# Altium PCB HIL_project.PcbDoc (part 2 of 3)
Units mm, origin at the board's own origin, x right, y up, seen from the top; angles counter-clockwise.
Board outline 165 x 120 mm, 2 copper layers (Top Layer, Bottom Layer); 116 components, 232 nets, 732 pads, 1218 vias.
Unrouted connection lines stored in the file: 107.
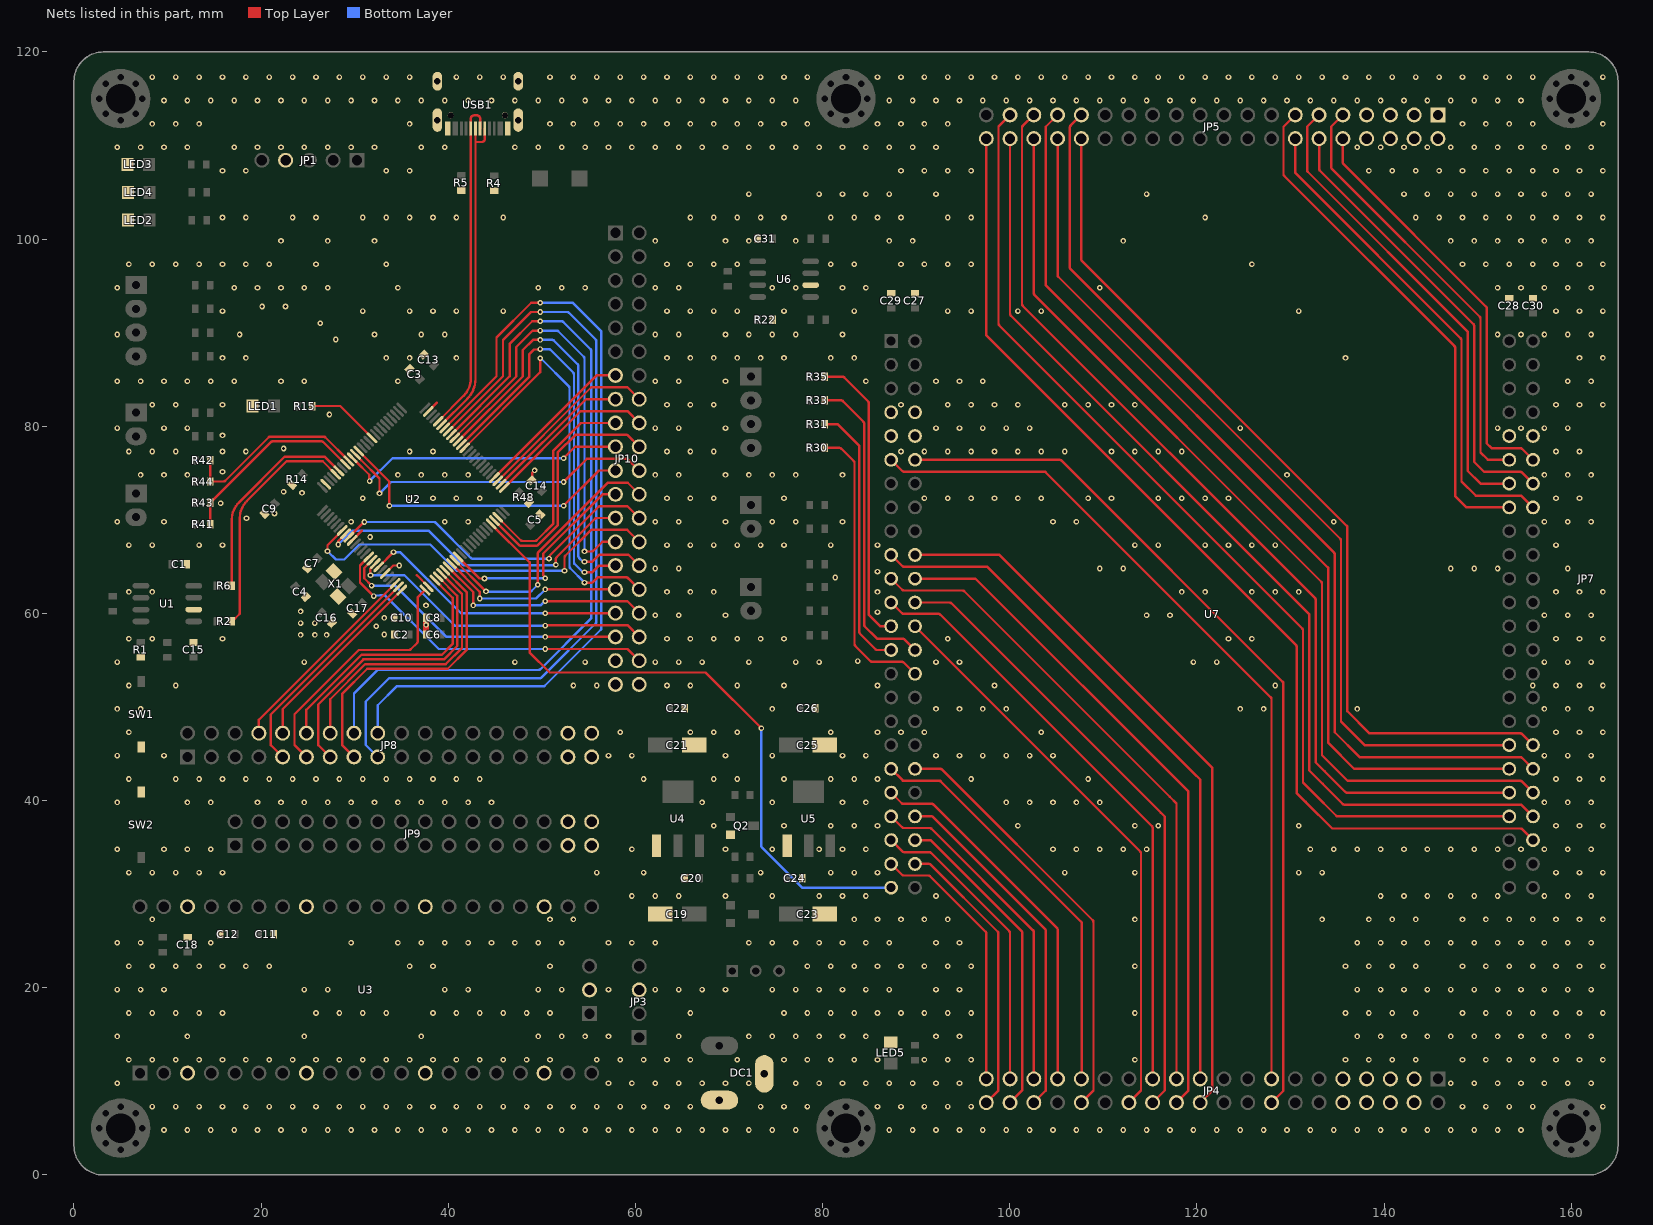
[diagram p2: the nets of this part, all layers, seen from the top]

## Via types
v1: diameter 0.6, hole 0.3, Top Layer to Bottom Layer, tented both sides, 1218 vias

## Nets (pads, with @x,y where several pads share a name; then routed paths per layer and width w, separated by ;. In a path a pad name is that pad's centre, name@x,y a point inside that pad or via, vN(x,y) a via of type N, cw(c..) or ccw(c..) an arc to the next point about the centre after c; other vN are vias at no path point) (continued)
DUT_PC7: JP4.16 U7.37 | length 43.9
  Top Layer w0.254: U7.37@87.329,43.394 88.583,42.14 92.43,42.14 cw(c92.43,41.886) 92.557,42.106 cw(c92.43,41.886) 92.609,42.066 107.626,27.049 cw(c107.446,26.87) 107.666,26.997 cw(c107.446,26.87) 107.7,26.87 107.7,10.321 JP4.16@107.649,10.27
DUT_PC8: JP4.25 U7.38 | length 45.7
  Top Layer w0.254: U7.38@89.869,43.394 92.576,43.394 cw(c92.576,43.14) 92.728,43.343 cw(c92.576,43.14) 92.755,43.32 108.868,27.207 cw(c108.687,27.028) 108.891,27.181 cw(c108.687,27.028) 108.941,27.028 108.941,9.022 JP4.25@107.649,7.73
DUT_PC10: R30.1 U7.30 | length 31.1
  Top Layer w0.254: R30.1@80.217,77.684 81.811,77.684 cw(c81.811,77.43) 81.963,77.633 cw(c81.811,77.43) 81.99,77.61 83.34,76.26 cw(c83.16,76.08) 83.414,76.08 83.414,56.715 ccw(c83.668,56.716) 83.488,56.537 83.489,56.536 85.126,54.899 85.127,54.898 ccw(c85.305,55.079) 85.304,54.825 88.493,54.825 cw(c88.493,54.571) 88.672,54.751 U7.30@89.869,53.554
DUT_PC11: R31.1 U7.27 | length 28.8
  Top Layer w0.254: R31.1@80.217,80.224 81.521,80.224 cw(c81.521,79.97) 81.673,80.173 cw(c81.521,79.97) 81.7,80.15 83.852,77.998 cw(c83.673,77.818) 83.927,77.818 83.927,58.002 ccw(c84.181,58.003) 84,57.825 84.001,57.824 85.658,56.167 ccw(c85.836,56.348) 85.835,56.094 U7.27@87.329,56.094
DUT_PC12: R33.1 U7.28 | length 33.4
  Top Layer w0.254: R33.1@80.217,82.764 81.981,82.764 cw(c81.981,82.51) 82.133,82.713 cw(c81.981,82.51) 82.16,82.69 84.362,80.488 cw(c84.183,80.308) 84.437,80.308 84.437,58.793 ccw(c84.691,58.794) 84.51,58.615 84.511,58.614 85.752,57.373 ccw(c85.93,57.554) 85.929,57.3 88.558,57.3 cw(c88.558,57.046) 88.737,57.226 U7.28@89.869,56.094
DUT_PC13: JP5.7 U7.63 | length 55.1
  Top Layer w0.254: JP5.7@130.509,113.27 129.25,112.011 129.25,106.93 ccw(c129.504,106.93) 129.301,106.778 ccw(c129.504,106.93) 129.324,106.751 147.513,88.562 cw(c147.334,88.382) 147.537,88.534 cw(c147.334,88.382) 147.588,88.382 147.588,72.537 148.791,71.334 U7.63@153.369,71.334
DUT_PD0: R35.1 U7.25 | length 31.4
  Top Layer w0.254: R35.1@80.217,85.304 82.116,85.304 cw(c82.116,85.05) 82.268,85.253 cw(c82.116,85.05) 82.295,85.23 84.851,82.674 cw(c84.671,82.494) 84.925,82.494 84.925,59.954 ccw(c85.179,59.955) 84.999,59.776 85,59.775 86.067,58.708 ccw(c86.246,58.888) 86.246,58.634 U7.25@87.329,58.634
DUT_PD1: JP4.27 U7.26 | length 61.4
  Top Layer w0.254: U7.26@89.869,58.634 113.948,34.555 cw(c113.768,34.376) 113.971,34.528 cw(c113.768,34.376) 114.022,34.376 114.022,9.023 JP4.27@112.729,7.73
DUT_PD2: JP4.13 U7.23 | length 64.8
  Top Layer w0.254: U7.23@87.329,61.174 88.479,60.024 ccw(c88.658,60.204) 88.658,59.95 92.395,59.95 cw(c92.395,59.696) 92.547,59.899 cw(c92.395,59.696) 92.574,59.876 115.195,37.255 cw(c115.015,37.076) 115.218,37.228 cw(c115.015,37.076) 115.269,37.076 JP4.13@115.269,10.27
DUT_PD3: JP4.28 U7.24 | length 67.3
  Top Layer w0.254: U7.24@89.869,61.174 93.571,61.174 cw(c93.571,60.92) 93.723,61.123 cw(c93.571,60.92) 93.75,61.1 116.134,38.716 116.561,38.289 116.561,9.022 JP4.28@115.269,7.73
DUT_PD4: JP4.12 U7.21 | length 69.8
  Top Layer w0.254: U7.21@87.329,63.714 88.519,62.524 ccw(c88.698,62.704) 88.698,62.45 94.951,62.45 cw(c94.951,62.196) 95.104,62.399 cw(c94.951,62.196) 95.131,62.376 117.101,40.405 117.809,39.697 JP4.12@117.809,10.27
DUT_PD5: JP4.29 U7.22 | length 72.4
  Top Layer w0.254: U7.22@89.869,63.714 96.335,63.714 119.09,40.959 119.09,9.011 JP4.29@117.809,7.73
DUT_PD6: JP4.11 U7.19 | length 74.9
  Top Layer w0.254: U7.19@87.329,66.254 88.534,65.049 ccw(c88.713,65.229) 88.713,64.975 97.613,64.975 98.531,64.056 ; 98.528,64.06 119.638,42.95 120.349,42.239 JP4.11@120.349,10.27
DUT_PD7: JP4.30 U7.20 | length 77.5
  Top Layer w0.254: U7.20@89.869,66.254 98.892,66.254 121.65,43.496 121.65,9.031 JP4.30@120.349,7.73
DUT_PD9: JP4.20 U7.45 | length 28.8
  Top Layer w0.254: U7.45@87.329,33.234 88.489,32.074 ccw(c88.668,32.254) 88.668,32 91.295,32 cw(c91.295,31.746) 91.447,31.949 cw(c91.295,31.746) 91.474,31.926 97.415,25.985 cw(c97.235,25.806) 97.438,25.958 cw(c97.235,25.806) 97.489,25.806 JP4.20@97.489,10.27
DUT_PD10: JP4.21 U7.46 | length 30.6
  Top Layer w0.254: U7.46@89.869,33.234 91.361,33.234 cw(c91.361,32.98) 91.513,33.183 cw(c91.361,32.98) 91.54,33.16 98.708,25.992 cw(c98.528,25.813) 98.731,25.965 cw(c98.528,25.813) 98.782,25.813 98.782,9.023 JP4.21@97.489,7.73
DUT_PD11: JP4.19 U7.43 | length 32.4
  Top Layer w0.254: U7.43@87.329,35.774 88.529,34.574 ccw(c88.708,34.754) 88.708,34.5 91.395,34.5 cw(c91.395,34.246) 91.547,34.449 cw(c91.395,34.246) 91.574,34.426 99.955,26.045 cw(c99.775,25.866) 99.978,26.018 cw(c99.775,25.866) 100.029,25.866 JP4.19@100.029,10.27
DUT_PD12: JP4.22 U7.44 | length 34.3
  Top Layer w0.254: U7.44@89.869,35.774 91.446,35.774 cw(c91.446,35.52) 91.598,35.723 cw(c91.446,35.52) 91.625,35.7 101.248,26.077 cw(c101.067,25.898) 101.271,26.051 cw(c101.067,25.898) 101.321,25.898 101.321,9.022 JP4.22@100.029,7.73
DUT_PD13: JP4.18 U7.41 | length 36.1
  Top Layer w0.254: U7.41@87.329,38.314 88.494,37.149 ccw(c88.673,37.329) 88.673,37.075 91.445,37.075 cw(c91.445,36.821) 91.597,37.024 cw(c91.445,36.821) 91.624,37.001 102.495,26.13 cw(c102.315,25.951) 102.518,26.103 cw(c102.315,25.951) 102.569,25.951 JP4.18@102.569,10.27
DUT_PD14: JP4.23 U7.42 | length 38
  Top Layer w0.254: U7.42@89.869,38.314 91.631,38.314 cw(c91.631,38.06) 91.783,38.263 cw(c91.631,38.06) 91.81,38.24 103.776,26.274 cw(c103.596,26.095) 103.799,26.247 cw(c103.596,26.095) 103.85,26.095 103.85,9.011 JP4.23@102.569,7.73
DUT_PD15: JP4.17 U7.39 | length 39.8
  Top Layer w0.254: U7.39@87.329,40.854 88.459,39.724 ccw(c88.638,39.904) 88.638,39.65 91.67,39.65 cw(c91.67,39.396) 91.822,39.599 cw(c91.67,39.396) 91.849,39.576 105.035,26.39 cw(c104.855,26.211) 105.058,26.363 cw(c104.855,26.211) 105.109,26.211 JP4.17@105.109,10.27
DUT_PE0: JP4.8 U7.11 | length 91.8
  Top Layer w0.254: U7.11@87.329,76.414 88.519,75.224 ccw(c88.698,75.404) 88.698,75.15 103.67,75.15 cw(c103.67,74.896) 103.822,75.099 cw(c103.67,74.896) 103.849,75.076 127.895,51.03 cw(c127.715,50.851) 127.918,51.003 cw(c127.715,50.851) 127.969,50.851 JP4.8@127.969,10.27
DUT_PE1: JP4.33 U7.12 | length 94.6
  Top Layer w0.254: U7.12@89.869,76.414 105.331,76.414 cw(c105.331,76.16) 105.483,76.363 cw(c105.331,76.16) 105.51,76.34 129.161,52.689 cw(c128.981,52.51) 129.184,52.662 cw(c128.981,52.51) 129.235,52.51 129.235,8.996 JP4.33@127.969,7.73
DUT_PE2: JP5.36 U7.60 | length 44.6
  Top Layer w0.254: JP5.36@135.589,110.73 135.589,108.191 ccw(c135.843,108.191) 135.64,108.039 ccw(c135.843,108.191) 135.663,108.012 150.901,92.774 cw(c150.721,92.595) 150.941,92.722 cw(c150.721,92.595) 150.975,92.595 150.975,78.175 151.485,77.665 154.553,77.665 cw(c154.553,77.411) 154.732,77.591 U7.60@155.909,76.414
DUT_PE3: JP5.5 U7.59 | length 46.6
  Top Layer w0.254: JP5.5@135.589,113.27 134.35,112.031 134.35,107.68 ccw(c134.604,107.68) 134.401,107.528 ccw(c134.604,107.68) 134.424,107.501 150.224,91.701 cw(c150.044,91.522) 150.247,91.675 cw(c150.044,91.522) 150.298,91.522 150.298,77.202 151.086,76.414 U7.59@153.369,76.414
DUT_PE4: JP5.35 U7.62 | length 48.6
  Top Layer w0.254: JP5.35@133.049,110.73 133.049,107.506 ccw(c133.303,107.506) 133.1,107.354 ccw(c133.303,107.506) 133.123,107.327 149.546,90.904 cw(c149.366,90.725) 149.569,90.877 cw(c149.366,90.725) 149.62,90.725 149.62,76.205 150.7,75.125 154.553,75.125 cw(c154.553,74.871) 154.732,75.051 U7.62@155.909,73.874
DUT_PE5: JP5.6 U7.61 | length 50.6
  Top Layer w0.254: JP5.6@133.049,113.27 131.775,111.996 131.775,107.38 ccw(c132.029,107.38) 131.826,107.228 ccw(c132.029,107.38) 131.849,107.201 148.868,90.182 cw(c148.689,90.002) 148.892,90.154 cw(c148.689,90.002) 148.943,90.002 148.943,75.232 150.301,73.874 U7.61@153.369,73.874
DUT_PE6: JP5.34 U7.64 | length 52.7
  Top Layer w0.254: JP5.34@130.509,110.73 130.509,107.171 ccw(c130.763,107.171) 130.56,107.019 ccw(c130.763,107.171) 130.583,106.992 148.191,89.384 cw(c148.011,89.204) 148.214,89.357 cw(c148.011,89.204) 148.265,89.204 148.265,74.11 149.79,72.585 154.553,72.585 cw(c154.553,72.331) 154.732,72.511 U7.64@155.909,71.334
DUT_PE7: JP5.25 U7.84 | length 94.3
  Top Layer w0.254: JP5.25@107.649,110.73 107.649,97.831 ccw(c107.903,97.831) 107.7,97.679 ccw(c107.903,97.831) 107.723,97.652 135.997,69.378 cw(c135.818,69.198) 136.021,69.35 cw(c135.818,69.198) 136.072,69.198 136.072,49.554 138.441,47.185 154.553,47.185 cw(c154.553,46.931) 154.732,47.111 U7.84@155.909,45.934
DUT_PE8: JP5.16 U7.83 | length 96.3
  Top Layer w0.254: JP5.16@107.649,113.27 106.499,112.12 ccw(c106.679,111.941) 106.476,112.093 ccw(c106.679,111.941) 106.425,111.941 106.425,96.98 ccw(c106.679,96.98) 106.476,96.828 ccw(c106.679,96.98) 106.499,96.801 135.32,67.98 cw(c135.14,67.8) 135.344,67.953 cw(c135.14,67.8) 135.394,67.8 135.394,48.454 137.914,45.934 U7.83@153.369,45.934
DUT_PE9: JP5.24 U7.86 | length 98.5
  Top Layer w0.254: JP5.24@105.109,110.73 105.109,96.146 ccw(c105.363,96.146) 105.16,95.994 ccw(c105.363,96.146) 105.183,95.967 134.643,66.507 cw(c134.463,66.328) 134.666,66.48 cw(c134.463,66.328) 134.717,66.328 134.717,47.305 137.377,44.645 154.553,44.645 cw(c154.553,44.391) 154.732,44.571 U7.86@155.909,43.394
DUT_PE10: JP5.17 U7.85 | length 100.6
  Top Layer w0.254: JP5.17@105.109,113.27 103.85,112.011 103.85,95.155 ccw(c104.104,95.155) 103.901,95.003 ccw(c104.104,95.155) 103.924,94.976 133.965,64.935 cw(c133.786,64.755) 133.989,64.908 cw(c133.786,64.755) 134.04,64.755 134.04,46.155 136.801,43.394 U7.85@153.369,43.394
DUT_PE11: JP5.23 U7.88 | length 102.8
  Top Layer w0.254: JP5.23@102.569,110.73 102.569,94.211 ccw(c102.823,94.211) 102.62,94.059 ccw(c102.823,94.211) 102.643,94.032 133.288,63.387 cw(c133.108,63.208) 133.311,63.36 cw(c133.108,63.208) 133.362,63.208 133.362,44.855 136.112,42.105 154.553,42.105 cw(c154.553,41.851) 154.732,42.031 U7.88@155.909,40.854
DUT_PE12: JP5.18 U7.87 | length 104.7
  Top Layer w0.254: JP5.18@102.569,113.27 101.374,112.075 ccw(c101.554,111.896) 101.351,112.048 ccw(c101.554,111.896) 101.3,111.896 101.3,93.055 ccw(c101.554,93.055) 101.351,92.903 ccw(c101.554,93.055) 101.374,92.876 132.61,61.64 cw(c132.431,61.46) 132.634,61.612 cw(c132.431,61.46) 132.685,61.46 132.685,44.09 133.65,43.125 ; 133.646,43.129 135.848,40.927 ccw(c136.026,41.108) 136.025,40.854 U7.87@153.369,40.854
DUT_PE13: JP5.22 U7.90 | length 106.7
  Top Layer w0.254: JP5.22@100.029,110.73 100.029,92.001 ccw(c100.283,92.001) 100.08,91.849 ccw(c100.283,92.001) 100.103,91.822 131.933,59.992 cw(c131.753,59.813) 131.956,59.965 cw(c131.753,59.813) 132.007,59.813 132.007,43.218 133.425,41.8 ; 133.421,41.804 135.586,39.639 ccw(c135.765,39.819) 135.613,39.616 ccw(c135.765,39.819) 135.765,39.565 154.553,39.565 cw(c154.553,39.311) 154.732,39.491 U7.90@155.909,38.314
DUT_PE14: JP5.19 U7.89 | length 108.8
  Top Layer w0.254: JP5.19@100.029,113.27 98.8,112.041 98.8,90.955 ccw(c99.054,90.955) 98.851,90.803 ccw(c99.054,90.955) 98.874,90.776 131.255,58.395 cw(c131.076,58.215) 131.279,58.367 cw(c131.076,58.215) 131.33,58.215 131.33,41.945 132.362,40.912 ; 132.359,40.916 134.887,38.388 ccw(c135.066,38.568) 134.914,38.365 ccw(c135.066,38.568) 135.066,38.314 U7.89@153.369,38.314
DUT_PE15: JP5.21 U7.92 | length 111
  Top Layer w0.254: JP5.21@97.489,110.73 97.489,89.816 ccw(c97.743,89.816) 97.54,89.664 ccw(c97.743,89.816) 97.563,89.637 130.578,56.622 cw(c130.398,56.442) 130.602,56.595 cw(c130.398,56.442) 130.652,56.442 130.652,40.823 131.612,39.862 ; 131.609,39.866 134.45,37.025 154.553,37.025 cw(c154.553,36.771) 154.732,36.951 U7.92@155.909,35.774
DUT_POWER_STATUS: U2.46 U7.47 | length 71.9
  Top Layer w0.254: U2.46@44.584,69.571 48.692,65.463 48.692,55.831 50.839,53.684 67.5,53.684 v1(73.457,47.727)
  Bottom Layer w0.254: v1(73.457,47.727) 73.457,35.156 ccw(c73.711,35.157) 73.53,34.979 77.742,30.767 ccw(c77.92,30.948) 77.918,30.694 U7.47@87.329,30.694
GND: C1.2 C2.2 C3.2 C4.2 C5.2 C6.2 C7.2 C8.2 C9.2 C10.2 C11.2 C12.2 C13.1 C14.1 C15.1 C16.1 C17.2 C18.1 C19.2 C20.1 C21.2 C22.1 C23.2 C24.1 C25.2 C26.1 C27.2 C28.2 C29.2 C30.2 C31.2 DC1.2 DC1.3 JP1.4 JP3.3 JP4.2 JP4.3 JP4.4 JP4.5 JP4.36 JP4.37 JP4.38 JP4.39 JP5.1 JP5.2 JP5.3 JP5.4 JP5.37 JP5.38 JP5.39 JP5.40 JP7.2 JP8.17 JP8.18 JP8.19 JP8.20 JP9.15 JP9.16 JP9.17 JP9.18 JP10.19 JP10.20 JP10.21 LED1.2 LED2.2 LED3.2 LED4.2 LED5.2 Q2.1 R1.1 R4.2 R5.2 R14.2 R22.1 R48.1 SW1.1 SW2.1 U1.2 U2.10 U2.20 U2.27 U2.74 U2.99 U3.3 U3.8 U3.13 U3.18 U3.23 U3.28 U3.33 U3.38 U3.D2 U4.1 U5.1 U6.2 U7.7 U7.8 U7.9 U7.10 U7.57 U7.58 USB1.A1 USB1.B1 USB1.SHIELD X1.2 X1.4 | length 9.4
  Top Layer w0.254: U2.10@29.734,67.804 30.783,68.852 ; U2.20@33.27,64.268 34.127,65.126 v1(34.773,65.126) ; 36.629,64.091 U2.27@37.866,62.854 ; U2.74@37.866,81.592 38.797,82.523 ; C14.1@48.888,74.2 48.959,74.271 48.959,75.019 v1(49.225,75.286)
  Top Layer w0.635: C6.2@37.634,57.745 C8.2@37.634,59.523
  other v1: 9.622,4.804 12.122,4.804 14.622,4.804 17.122,4.804 19.622,4.804 22.122,4.804 24.622,4.804 27.122,4.804 29.622,4.804 32.122,4.804 34.622,4.804 37.122,4.804 39.622,4.804 42.122,4.804 44.622,4.804 47.122,4.804 49.622,4.804 52.122,4.804 54.622,4.804 57.122,4.804 59.622,4.804 62.122,4.804 64.622,4.804 67.122,4.804 69.622,4.804 72.122,4.804 74.622,4.804 77.122,4.804 87.122,4.804 89.622,4.804 92.122,4.804 94.622,4.804 97.122,4.804 99.622,4.804 102.122,4.804 104.622,4.804 107.122,4.804 109.622,4.804 112.122,4.804 114.622,4.804 117.122,4.804 119.622,4.804 122.122,4.804 124.622,4.804 127.122,4.804 129.622,4.804 132.122,4.804 134.622,4.804 137.122,4.804 139.622,4.804 142.122,4.804 144.622,4.804 147.122,4.804 149.622,4.804 152.122,4.804 154.622,4.804 8.372,7.304 10.872,7.304 13.372,7.304 15.872,7.304 18.372,7.304 20.872,7.304 23.372,7.304 25.872,7.304 28.372,7.304 30.872,7.304 33.372,7.304 35.872,7.304 38.372,7.304 40.872,7.304 43.372,7.304 45.872,7.304 48.372,7.304 50.872,7.304 53.372,7.304 55.872,7.304 58.372,7.304 60.872,7.304 63.372,7.304 65.872,7.304 73.372,7.304 75.872,7.304 78.372,7.304 85.872,7.304 88.372,7.304 90.872,7.304 93.372,7.304 95.872,7.304 148.372,7.304 150.872,7.304 153.372,7.304 155.872,7.304 163.372,7.304 4.622,9.804 57.122,9.804 59.622,9.804 62.122,9.804 64.622,9.804 67.122,9.804 69.622,9.804 72.122,9.804 77.122,9.804 79.622,9.804 82.122,9.804 84.622,9.804 87.122,9.804 89.622,9.804 92.122,9.804 94.622,9.804 147.122,9.804 149.622,9.804 152.122,9.804 154.622,9.804 157.122,9.804 159.622,9.804 162.122,9.804 5.872,12.304 8.372,12.304 10.872,12.304 13.372,12.304 15.872,12.304 18.372,12.304 20.872,12.304 23.372,12.304 25.872,12.304 28.372,12.304 30.872,12.304 33.372,12.304 35.872,12.304 38.372,12.304 40.872,12.304 43.372,12.304 45.872,12.304 48.372,12.304 50.872,12.304 55.872,12.304 58.372,12.304 60.872,12.304 63.372,12.304 65.872,12.304 70.872,12.304 75.872,12.304 78.372,12.304 80.872,12.304 83.372,12.304 85.872,12.304 90.872,12.304 93.372,12.304 95.872,12.304 113.372,12.304 135.872,12.304 138.372,12.304 140.872,12.304 143.372,12.304 148.372,12.304 150.872,12.304 153.372,12.304 155.872,12.304 158.372,12.304 160.872,12.304 163.372,12.304 4.622,14.804 12.122,14.804 24.622,14.804 37.122,14.804 49.622,14.804 52.122,14.804 54.622,14.804 57.122,14.804 64.622,14.804 72.122,14.804 74.622,14.804 77.122,14.804 79.622,14.804 82.122,14.804 84.622,14.804 92.122,14.804 94.622,14.804 137.122,14.804 139.622,14.804 142.122,14.804 144.622,14.804 147.122,14.804 149.622,14.804 152.122,14.804 154.622,14.804 157.122,14.804 159.622,14.804 162.122,14.804 5.872,17.304 8.372,17.304 10.872,17.304 13.372,17.304 15.872,17.304 25.872,17.304 28.372,17.304 30.872,17.304 33.372,17.304 38.372,17.304 40.872,17.304 43.372,17.304 45.872,17.304 48.372,17.304 50.872,17.304 65.872,17.304 75.872,17.304 78.372,17.304 80.872,17.304 83.372,17.304 85.872,17.304 88.372,17.304 90.872,17.304 93.372,17.304 95.872,17.304 113.372,17.304 135.872,17.304 138.372,17.304 140.872,17.304 143.372,17.304 148.372,17.304 150.872,17.304 153.372,17.304 155.872,17.304 158.372,17.304 160.872,17.304 163.372,17.304 4.622,19.804 7.122,19.804 9.622,19.804 24.622,19.804 27.122,19.804 39.622,19.804 42.122,19.804 49.622,19.804 52.122,19.804 57.122,19.804 62.122,19.804 64.622,19.804 67.122,19.804 69.622,19.804 74.622,19.804 77.122,19.804 79.622,19.804 82.122,19.804 84.622,19.804 87.122,19.804 92.122,19.804 94.622,19.804 137.122,19.804 139.622,19.804 142.122,19.804 144.622,19.804 147.122,19.804 149.622,19.804 152.122,19.804 154.622,19.804 157.122,19.804 159.622,19.804 162.122,19.804 5.872,22.304 8.372,22.304 10.872,22.304 13.372,22.304 15.872,22.304 18.372,22.304 20.872,22.304 35.872,22.304 38.372,22.304 50.872,22.304 78.372,22.304 80.872,22.304 83.372,22.304 85.872,22.304 88.372,22.304 90.872,22.304 93.372,22.304 95.872,22.304 113.372,22.304 135.872,22.304 138.372,22.304 140.872,22.304 143.372,22.304 148.372,22.304 150.872,22.304 153.372,22.304 155.872,22.304 158.372,22.304 160.872,22.304 163.372,22.304 4.622,24.804 7.122,24.804 14.622,24.804 29.622,24.804 34.622,24.804 37.122,24.804 39.622,24.804 42.122,24.804 44.622,24.804 47.122,24.804 49.622,24.804 52.122,24.804 57.122,24.804 59.622,24.804 62.122,24.804 72.122,24.804 74.622,24.804 77.122,24.804 79.622,24.804 82.122,24.804 84.622,24.804 87.122,24.804 92.122,24.804 94.622,24.804 137.122,24.804 139.622,24.804 142.122,24.804 144.622,24.804 147.122,24.804 149.622,24.804 152.122,24.804 154.622,24.804 157.122,24.804 159.622,24.804 162.122,24.804 8.372,27.304 50.872,27.304 53.372,27.304 83.372,27.304 85.872,27.304 88.372,27.304 90.872,27.304 93.372,27.304 113.372,27.304 133.372,27.304 138.372,27.304 140.872,27.304 143.372,27.304 148.372,27.304 150.872,27.304 153.372,27.304 155.872,27.304 158.372,27.304 160.872,27.304 163.372,27.304 59.622,29.804 62.122,29.804 64.622,29.804 69.622,29.804 74.622,29.804 79.622,29.804 82.122,29.804 84.622,29.804 92.122,29.804 139.622,29.804 142.122,29.804 144.622,29.804 147.122,29.804 149.622,29.804 152.122,29.804 157.122,29.804 159.622,29.804 162.122,29.804 5.872,32.304 8.372,32.304 10.872,32.304 13.372,32.304 15.872,32.304 55.872,32.304 60.872,32.304 73.372,32.304 80.872,32.304 83.372,32.304 85.872,32.304 105.872,32.304 113.372,32.304 130.872,32.304 133.372,32.304 158.372,32.304 160.872,32.304 163.372,32.304 4.622,34.804 9.622,34.804 12.122,34.804 14.622,34.804 59.622,34.804 69.622,34.804 74.622,34.804 79.622,34.804 82.122,34.804 84.622,34.804 104.622,34.804 107.122,34.804 109.622,34.804 112.122,34.804 114.622,34.804 132.122,34.804 134.622,34.804 137.122,34.804 139.622,34.804 142.122,34.804 144.622,34.804 147.122,34.804 149.622,34.804 152.122,34.804 154.622,34.804 157.122,34.804 159.622,34.804 162.122,34.804 68.372,37.304 75.872,37.304 80.872,37.304 83.372,37.304 85.872,37.304 100.872,37.304 113.372,37.304 115.872,37.304 130.872,37.304 158.372,37.304 160.872,37.304 163.372,37.304 4.622,39.804 12.122,39.804 14.622,39.804 19.622,39.804 22.122,39.804 24.622,39.804 27.122,39.804 29.622,39.804 32.122,39.804 34.622,39.804 37.122,39.804 39.622,39.804 42.122,39.804 44.622,39.804 67.122,39.804 74.622,39.804 82.122,39.804 84.622,39.804 99.622,39.804 102.122,39.804 104.622,39.804 107.122,39.804 109.622,39.804 157.122,39.804 159.622,39.804 162.122,39.804 5.872,42.304 10.872,42.304 13.372,42.304 15.872,42.304 18.372,42.304 20.872,42.304 23.372,42.304 25.872,42.304 28.372,42.304 30.872,42.304 33.372,42.304 35.872,42.304 38.372,42.304 40.872,42.304 43.372,42.304 60.872,42.304 68.372,42.304 70.872,42.304 75.872,42.304 80.872,42.304 83.372,42.304 85.872,42.304 95.872,42.304 108.372,42.304 158.372,42.304 160.872,42.304 163.372,42.304 4.622,44.804 9.622,44.804 57.122,44.804 59.622,44.804 69.622,44.804 74.622,44.804 82.122,44.804 84.622,44.804 92.122,44.804 94.622,44.804 97.122,44.804 99.622,44.804 102.122,44.804 104.622,44.804 157.122,44.804 159.622,44.804 162.122,44.804 5.872,47.304 58.372,47.304 65.872,47.304 68.372,47.304 70.872,47.304 80.872,47.304 85.872,47.304 88.372,47.304 90.872,47.304 103.372,47.304 158.372,47.304 160.872,47.304 163.372,47.304 4.622,49.804 7.122,49.804 74.622,49.804 92.122,49.804 94.622,49.804 97.122,49.804 99.622,49.804 124.622,49.804 127.122,49.804 137.122,49.804 157.122,49.804 159.622,49.804 162.122,49.804 5.872,52.304 10.872,52.304 53.372,52.304 55.872,52.304 63.372,52.304 65.872,52.304 70.872,52.304 75.872,52.304 85.872,52.304 98.372,52.304 128.372,52.304 155.872,52.304 158.372,52.304 160.872,52.304 163.372,52.304 4.622,54.804 24.622,54.804 47.122,54.804 54.622,54.804 62.122,54.804 64.622,54.804 67.122,54.804 72.122,54.804 77.122,54.804 79.622,54.804 92.122,54.804 94.622,54.804 119.622,54.804 122.122,54.804 157.122,54.804 159.622,54.804 162.122,54.804 83.751,54.903 5.872,57.304 8.372,57.304 15.872,57.304 63.372,57.304 65.872,57.304 68.372,57.304 70.872,57.304 73.372,57.304 75.872,57.304 93.372,57.304 123.372,57.304 125.872,57.304 158.372,57.304 160.872,57.304 163.372,57.304 24.225,57.709 25.751,57.709 27.005,57.709 33.169,57.745 32.309,58.639 37.634,58.773 24.225,58.963 25.727,58.963 33.157,59.523 62.122,59.804 64.622,59.804 69.622,59.804 114.622,59.804 117.122,59.804 157.122,59.804 159.622,59.804 162.122,59.804 85.872,60.142 24.225,60.217 37.618,60.858 5.872,62.304 8.372,62.304 63.372,62.304 65.872,62.304 68.372,62.304 85.872,62.304 118.372,62.304 120.872,62.304 125.872,62.304 128.372,62.304 130.872,62.304 158.372,62.304 160.872,62.304 163.372,62.304 81.354,63.838 85.872,64.466 62.122,64.804 64.622,64.804 109.622,64.804 112.122,64.804 147.122,64.804 149.622,64.804 152.122,64.804 159.622,64.804 5.872,67.304 8.372,67.304 13.372,67.304 15.872,67.304 63.372,67.304 65.872,67.304 68.372,67.304 70.872,67.304 73.372,67.304 75.872,67.304 80.872,67.304 85.872,67.304 113.372,67.304 115.872,67.304 120.872,67.304 123.372,67.304 125.872,67.304 128.372,67.304 158.372,67.304 31.648,68.172 4.622,69.804 9.622,69.804 29.622,69.804 39.622,69.804 42.122,69.804 62.122,69.804 64.622,69.804 69.622,69.804 74.622,69.804 77.122,69.804 82.122,69.804 104.622,69.804 107.122,69.804 134.622,69.804 157.122,69.804 159.622,69.804 162.122,69.804 18.437,70.178 21.438,70.677 15.67,71.77 30.872,72.304 35.872,72.304 38.372,72.304 40.872,72.304 43.372,72.304 63.372,72.304 65.872,72.304 68.372,72.304 75.872,72.304 90.872,72.304 93.372,72.304 95.872,72.304 98.372,72.304 100.872,72.304 103.372,72.304 108.372,72.304 110.872,72.304 115.872,72.304 118.372,72.304 120.872,72.304 123.372,72.304 158.372,72.304 160.872,72.304 24.377,72.883 22.405,72.995 7.122,74.804 9.622,74.804 12.122,74.804 34.622,74.804 37.122,74.804 39.622,74.804 42.122,74.804 62.122,74.804 64.622,74.804 69.622,74.804 72.122,74.804 74.622,74.804 77.122,74.804 82.122,74.804 129.622,74.804 157.122,74.804 159.622,74.804 162.122,74.804 15.872,75.133 5.872,77.304 8.372,77.304 10.872,77.304 15.872,77.304 18.372,77.304 35.872,77.304 38.372,77.304 63.372,77.304 65.872,77.304 68.372,77.304 88.372,77.304 90.872,77.304 93.372,77.304 95.872,77.304 98.372,77.304 100.872,77.304 103.372,77.304 105.872,77.304 110.872,77.304 113.372,77.304 115.872,77.304 118.372,77.304 158.372,77.304 160.872,77.304 22.405,77.619 15.872,79.019 4.622,79.804 9.622,79.804 12.122,79.804 62.122,79.804 64.622,79.804 69.622,79.804 92.122,79.804 94.622,79.804 97.122,79.804 99.622,79.804 102.122,79.804 124.622,79.804 152.122,79.804 154.622,79.804 157.122,79.804 159.622,79.804 27.3,81.257 8.372,82.304 10.872,82.304 15.872,82.304 63.372,82.304 65.872,82.304 68.372,82.304 88.372,82.304 93.372,82.304 95.872,82.304 98.372,82.304 100.872,82.304 105.872,82.304 108.372,82.304 110.872,82.304 113.372,82.304 158.372,82.304 160.872,82.304 163.372,82.304 4.622,84.804 7.122,84.804 9.622,84.804 12.122,84.804 14.622,84.804 17.122,84.804 22.122,84.804 24.622,84.804 34.622,84.804 62.122,84.804 64.622,84.804 69.622,84.804 84.622,84.804 92.122,84.804 94.622,84.804 97.122,84.804 159.622,84.804 162.122,84.804 15.872,87.304 18.372,87.304 33.372,87.304 35.872,87.304 40.872,87.304 63.372,87.304 65.872,87.304 68.372,87.304 70.872,87.304 73.372,87.304 75.872,87.304 80.872,87.304 83.372,87.304 135.872,87.304 160.872,87.304 163.372,87.304 27.981,89.265 4.622,89.804 17.702,89.804 32.122,89.804 37.122,89.804 39.622,89.804 62.122,89.804 64.622,89.804 69.622,89.804 72.122,89.804 74.622,89.804 77.122,89.804 82.122,89.804 152.122,89.804 154.622,89.804 157.122,89.804 159.622,89.804 162.122,89.804 26.314,91.008 15.872,92.304 30.872,92.304 35.872,92.304 38.372,92.304 40.872,92.304 45.872,92.304 63.372,92.304 65.872,92.304 68.372,92.304 70.872,92.304 75.872,92.304 83.372,92.304 93.372,92.304 95.872,92.304 100.872,92.304 103.372,92.304 130.872,92.304 158.372,92.304 160.872,92.304 163.372,92.304 20.11,92.8 22.61,92.8 4.622,94.804 17.122,94.804 19.622,94.804 22.122,94.804 24.622,94.804 27.122,94.804 34.622,94.804 49.622,94.804 52.122,94.804 54.622,94.804 62.122,94.804 64.622,94.804 74.622,94.804 77.122,94.804 82.122,94.804 84.622,94.804 109.622,94.804 152.122,94.804 154.622,94.804 157.122,94.804 159.622,94.804 162.122,94.804 5.872,97.304 8.372,97.304 10.872,97.304 13.372,97.304 15.872,97.304 18.372,97.304 20.872,97.304 25.872,97.304 33.372,97.304 63.372,97.304 65.872,97.304 68.372,97.304 70.872,97.304 80.872,97.304 83.372,97.304 88.372,97.304 90.872,97.304 93.372,97.304 95.872,97.304 125.872,97.304 148.372,97.304 150.872,97.304 153.372,97.304 155.872,97.304 158.372,97.304 160.872,97.304 163.372,97.304 22.122,99.804 27.122,99.804 32.122,99.804 62.122,99.804 69.622,99.804 72.122,99.804 77.122,99.804 87.122,99.804 89.622,99.804 112.122,99.804 147.122,99.804 149.622,99.804 152.122,99.804 154.622,99.804 157.122,99.804 159.622,99.804 162.122,99.804 15.872,102.304 18.372,102.304 23.372,102.304 25.872,102.304 30.872,102.304 33.372,102.304 35.872,102.304 38.372,102.304 40.872,102.304 45.872,102.304 65.872,102.304 68.372,102.304 70.872,102.304 73.372,102.304 75.872,102.304 80.872,102.304 83.372,102.304 85.872,102.304 88.372,102.304 93.372,102.304 95.872,102.304 120.872,102.304 143.372,102.304 145.872,102.304 148.372,102.304 150.872,102.304 153.372,102.304 155.872,102.304 158.372,102.304 160.872,102.304 163.372,102.304 72.122,104.804 79.622,104.804 82.122,104.804 84.622,104.804 87.122,104.804 92.122,104.804 114.622,104.804 142.122,104.804 144.622,104.804 147.122,104.804 149.622,104.804 152.122,104.804 154.622,104.804 157.122,104.804 159.622,104.804 162.122,104.804 15.872,107.304 18.372,107.304 33.372,107.304 35.872,107.304 88.372,107.304 90.872,107.304 93.372,107.304 95.872,107.304 138.372,107.304 140.872,107.304 143.372,107.304 145.872,107.304 148.372,107.304 150.872,107.304 153.372,107.304 155.872,107.304 158.372,107.304 160.872,107.304 163.372,107.304 4.622,109.804 7.122,109.804 9.622,109.804 12.122,109.804 17.122,109.804 19.622,109.804 22.122,109.804 24.622,109.804 27.122,109.804 29.622,109.804 32.122,109.804 37.122,109.804 39.622,109.804 47.122,109.804 49.622,109.804 52.122,109.804 54.622,109.804 57.122,109.804 59.622,109.804 62.122,109.804 64.622,109.804 67.122,109.804 69.622,109.804 72.122,109.804 74.622,109.804 77.122,109.804 79.622,109.804 82.122,109.804 84.622,109.804 87.122,109.804 89.622,109.804 92.122,109.804 137.122,109.804 139.622,109.804 142.122,109.804 144.622,109.804 147.122,109.804 149.622,109.804 152.122,109.804 154.622,109.804 157.122,109.804 159.622,109.804 162.122,109.804 8.372,112.304 10.872,112.304 13.372,112.304 35.872,112.304 50.872,112.304 53.372,112.304 55.872,112.304 58.372,112.304 60.872,112.304 63.372,112.304 65.872,112.304 68.372,112.304 70.872,112.304 73.372,112.304 75.872,112.304 78.372,112.304 85.872,112.304 88.372,112.304 90.872,112.304 93.372,112.304 148.372,112.304 150.872,112.304 153.372,112.304 155.872,112.304 163.372,112.304 9.622,114.804 12.122,114.804 14.622,114.804 17.122,114.804 19.622,114.804 22.122,114.804 24.622,114.804 27.122,114.804 29.622,114.804 32.122,114.804 34.622,114.804 37.122,114.804 39.622,114.804 42.122,114.804 44.622,114.804 47.122,114.804 49.622,114.804 52.122,114.804 54.622,114.804 57.122,114.804 59.622,114.804 62.122,114.804 64.622,114.804 67.122,114.804 69.622,114.804 72.122,114.804 74.622,114.804 77.122,114.804 87.122,114.804 89.622,114.804 92.122,114.804 94.622,114.804 97.122,114.804 99.622,114.804 102.122,114.804 104.622,114.804 107.122,114.804 109.622,114.804 112.122,114.804 114.622,114.804 117.122,114.804 119.622,114.804 122.122,114.804 124.622,114.804 127.122,114.804 129.622,114.804 132.122,114.804 134.622,114.804 137.122,114.804 139.622,114.804 142.122,114.804 144.622,114.804 147.122,114.804 149.622,114.804 152.122,114.804 154.622,114.804 8.372,117.304 10.872,117.304 13.372,117.304 15.872,117.304 18.372,117.304 20.872,117.304 23.372,117.304 25.872,117.304 28.372,117.304 30.872,117.304 33.372,117.304 35.872,117.304 40.872,117.304 43.372,117.304 45.872,117.304 50.872,117.304 53.372,117.304 55.872,117.304 58.372,117.304 60.872,117.304 63.372,117.304 65.872,117.304 68.372,117.304 70.872,117.304 73.372,117.304 75.872,117.304 78.372,117.304 85.872,117.304 88.372,117.304 90.872,117.304 93.372,117.304 95.872,117.304 98.372,117.304 100.872,117.304 103.372,117.304 105.872,117.304 108.372,117.304 110.872,117.304 113.372,117.304 115.872,117.304 118.372,117.304 120.872,117.304 123.372,117.304 125.872,117.304 128.372,117.304 130.872,117.304 133.372,117.304 135.872,117.304 138.372,117.304 140.872,117.304 143.372,117.304 145.872,117.304 148.372,117.304 150.872,117.304 153.372,117.304 155.872,117.304 163.372,117.304
HIL_CAN_RX: R6.2 U2.95 | length 22.5
  Top Layer w0.254: R6.2@16.882,62.952 16.882,70.055 cw(c19.422,70.055) 17.626,71.851 22.534,76.759 26.789,76.759 U2.95@28.32,75.228
HIL_CAN_TX: R2.2 U2.96 | length 25.2
  Top Layer w0.254: R2.2@16.882,59.142 17.659,59.919 ccw(c17.479,60.098) 17.682,59.946 ccw(c17.479,60.098) 17.733,60.098 17.733,70.22 cw(c20.273,70.22) 18.477,72.016 22.719,76.259 26.582,76.259 U2.96@27.966,74.875
HIL_D_N: U2.70 USB1.A7 USB1.B7 | length 35.3
  Top Layer w0.254: U2.70@39.28,80.178 42.022,82.92 ccw(c39.867,85.075) 42.915,85.075 42.915,110.369 ; USB1.A7@42.907,111.799 42.915,111.791 42.915,110.369 ; USB1.B7@43.907,111.799 43.907,110.719 cw(c43.557,110.719) 43.557,110.369 42.915,110.369
HIL_D_P: U2.71 USB1.A6 USB1.B6 | length 36.1
  Top Layer w0.254: U2.71@38.927,80.532 38.927,80.543 41.663,83.279 ccw(c39.867,85.075) 42.407,85.075 USB1.B6@42.407,111.799 42.407,112.865 cw(c42.757,112.865) 42.757,113.215 43.082,113.215 cw(c43.082,112.89) 43.407,112.89 USB1.A6@43.407,111.799
HIL_DEBUG_LED: R15.2 U2.85 | length 7.8
  Top Layer w0.254: R15.2@25.467,82.159 28.46,82.159 U2.85@31.856,78.764
HIL_I2C1_SCL: R41.2 R43.1 U2.93 | length 20.5
  Top Layer w0.254: R41.2@14.556,69.524 R43.1@14.556,71.81 21.062,78.316 cw(c21.241,78.136) 21.089,78.339 cw(c21.241,78.136) 21.241,78.39 26.467,78.39 cw(c26.467,78.136) 26.647,78.316 U2.93@29.027,75.935
HIL_I2C1_SDA: R42.2 R44.1 U2.92 | length 20.1
  Top Layer w0.254: R42.2@14.556,76.382 R44.1@14.556,74.096 15.991,74.096 ccw(c15.991,74.35) 16.143,74.147 ccw(c15.991,74.35) 16.17,74.17 20.818,78.818 ; 20.819,78.819 cw(c20.998,78.638) 20.845,78.842 cw(c20.998,78.638) 20.998,78.892 26.672,78.892 cw(c26.672,78.638) 26.852,78.818 U2.92@29.381,76.289
HIL_PA0: JP8.33 U2.23 | length 22
  Top Layer w0.254: JP8.33@19.765,47.204 19.765,48.642 U2.23@34.33,63.207
HIL_PA1: JP8.5 U2.24 | length 24.4
  Top Layer w0.254: JP8.5@22.305,44.664 21.035,45.934 21.035,49.205 U2.24@34.684,62.854
HIL_PA2: JP8.32 U2.25 | length 20.6
  Top Layer w0.254: JP8.32@22.305,47.204 22.305,49.768 U2.25@35.038,62.5
HIL_PA3: JP8.6 U2.26 | length 27.3
  Top Layer w0.254: JP8.6@24.845,44.664 23.575,45.934 23.575,49.236 30.433,56.094 35.821,56.094 ccw(c35.821,56.348) 35.974,56.145 ccw(c35.821,56.348) 36,56.168 36.653,56.821 ccw(c36.473,57) 36.676,56.848 ccw(c36.473,57) 36.727,57 36.727,61.715 U2.26@37.512,62.5
HIL_PA4: JP8.31 U2.29 | length 28.6
  Top Layer w0.254: JP8.31@24.845,47.204 24.845,49.706 30.725,55.586 39.323,55.586 40.466,56.729 40.466,61.668 39.193,62.941 U2.29@38.573,63.561
HIL_PA5: JP8.7 U2.30 | length 31.8
  Top Layer w0.254: JP8.7@27.385,44.664 26.115,45.934 26.115,50.269 30.932,55.086 39.53,55.086 40.966,56.522 40.966,61.875 U2.30@38.927,63.915
HIL_PA6: JP8.30 U2.31 | length 28.8
  Top Layer w0.254: JP8.30@27.385,47.204 27.385,50.832 31.139,54.586 39.737,54.586 41.466,56.315 41.466,62.082 U2.31@39.28,64.268
HIL_PA7: JP8.8 U2.32 | length 32
  Top Layer w0.254: JP8.8@29.925,44.664 28.655,45.934 28.655,51.395 31.346,54.086 39.944,54.086 41.966,56.108 41.966,62.289 U2.32@39.634,64.622
HIL_PA8: JP8.29 U2.67 | length 84.8
  Top Layer w0.254: U2.67@40.341,79.117 46.558,85.335 46.558,88.799 48.976,91.217 v1(49.835,91.217)
  Bottom Layer w0.254: JP8.29@29.925,47.204 29.925,51.45 32.425,53.95 49.65,53.95 ccw(c49.65,54.204) 49.803,54.001 ccw(c49.65,54.204) 49.829,54.024 55.206,59.401 ccw(c55.026,59.58) 55.229,59.427 ccw(c55.026,59.58) 55.28,59.58 55.28,88.042 ccw(c55.026,88.042) 55.206,88.221 52.284,91.143 ccw(c52.105,90.963) 52.258,91.166 ccw(c52.105,90.963) 52.105,91.217 v1(49.835,91.217)
HIL_PA9: JP8.9 U2.68 | length 89.4
  Top Layer w0.254: U2.68@39.987,79.471 45.854,85.338 45.854,89.212 48.851,92.208 v1(49.835,92.208)
  Bottom Layer w0.254: JP8.9@32.465,44.664 31.175,45.954 31.175,50.575 33.675,53.075 49.769,53.075 ccw(c49.769,53.329) 49.922,53.126 ccw(c49.769,53.329) 49.948,53.149 55.751,58.952 ccw(c55.571,59.131) 55.774,58.978 ccw(c55.571,59.131) 55.825,59.131 55.825,89.093 ccw(c55.571,89.093) 55.751,89.272 52.889,92.134 ccw(c52.71,91.954) 52.862,92.158 ccw(c52.71,91.954) 52.71,92.208 v1(49.835,92.208)
HIL_PA10: JP8.28 U2.69 | length 88
  Top Layer w0.254: U2.69@39.634,79.824 45.15,85.341 45.15,89.475 48.875,93.2 v1(49.835,93.2)
  Bottom Layer w0.254: JP8.28@32.465,47.204 32.465,50.19 34.475,52.2 50.139,52.2 ccw(c50.139,52.454) 50.291,52.251 ccw(c50.139,52.454) 50.318,52.274 56.294,58.249 ccw(c56.113,58.428) 56.317,58.276 ccw(c56.113,58.428) 56.367,58.428 56.367,90.14 53.381,93.126 ccw(c53.202,92.946) 53.354,93.149 ccw(c53.202,92.946) 53.202,93.2 v1(49.835,93.2)
HIL_PB0: JP10.29 U2.35 | length 28.4
  Top Layer w0.254: U2.35@40.694,65.682 40.698,65.682 44.023,62.357 v1(44.027,62.357) ; v1(49.555,63.068) 49.555,66.38 cw(c49.809,66.38) 49.606,66.533 cw(c49.809,66.38) 49.63,66.56 56.961,73.891 cw(c57.14,73.711) 56.988,73.914 cw(c57.14,73.711) 57.14,73.965 59.171,73.965 JP10.29@60.405,72.731
  Bottom Layer w0.254: v1(44.027,62.357) 44.052,62.332 48.645,62.332 ccw(c48.644,62.586) 48.705,62.339 48.797,62.362 ccw(c48.736,62.608) 48.915,62.428 v1(49.555,63.068)
HIL_PB1: JP10.12 U2.36 | length 23.5
  Top Layer w0.254: U2.36@41.048,66.036 43.355,63.729 v1(43.877,63.729) v1@44.009,63.729 ; v1@50.394,63.754 50.394,63.822 50.14,64.076 50.14,66.376 56.42,72.657 cw(c56.6,72.477) 56.447,72.68 cw(c56.6,72.477) 56.6,72.731 JP10.12@57.865,72.731
  Bottom Layer w0.254: v1(43.877,63.729) 43.89,63.741 50.381,63.741 v1@50.394,63.754
  other v1: 50.368,63.754
HIL_PB3: JP10.11 U2.89 | length 32.9
  Top Layer w0.254: U2.89@30.441,77.35 33.714,74.077 v1(33.714,71.501) ; v1(52.324,71.501) 56.094,75.271 JP10.11@57.865,75.271
  Bottom Layer w0.254: v1(33.714,71.501) v1(52.324,71.501)
HIL_PB4: JP10.30 U2.90 | length 35
  Top Layer w0.254: U2.90@30.088,76.996 30.708,76.376 32.656,74.428 v1(32.656,72.822) ; v1(52.324,74.041) 54.794,76.511 59.165,76.511 JP10.30@60.405,75.271
  Bottom Layer w0.254: v1(32.656,72.822) 33.875,74.041 v1(52.324,74.041)
HIL_PB5: JP10.10 U2.91 | length 31.1
  Top Layer w0.254: U2.91@29.734,76.642 30.151,76.225 31.553,74.824 31.553,74.187 v1(31.598,74.143) ; v1(52.324,76.581) 53.554,77.811 JP10.10@57.865,77.811
  Bottom Layer w0.254: v1(31.598,74.143) 34.036,76.581 v1(52.324,76.581)
HIL_PB10: JP10.31 U2.47 | length 26.5
  Top Layer w0.254: U2.47@44.937,69.925 47.546,67.316 ccw(c47.725,67.496) 47.725,67.242 49.419,67.242 ccw(c49.419,67.496) 49.571,67.293 ccw(c49.419,67.496) 49.598,67.316 51.689,69.407 51.689,77.191 53.579,79.081 59.03,79.081 cw(c59.03,78.827) 59.182,79.03 cw(c59.03,78.827) 59.209,79.007 JP10.31@60.405,77.811
HIL_PB11: JP10.9 U2.48 | length 23.4
  Top Layer w0.254: U2.48@45.291,70.278 47.753,67.816 ccw(c47.932,67.996) 47.932,67.742 49.272,67.742 ccw(c49.272,67.996) 49.425,67.793 ccw(c49.272,67.996) 49.451,67.816 51.232,69.596 51.232,77.41 54.173,80.351 JP10.9@57.865,80.351
HIL_PB12: JP10.32 U2.51 | length 18.3
  Top Layer w0.254: U2.51@45.998,73.46 54.158,81.621 59.135,81.621 JP10.32@60.405,80.351
HIL_PB13: JP10.8 U2.52 | length 16
  Top Layer w0.254: U2.52@45.644,73.814 54.721,82.891 JP10.8@57.865,82.891
HIL_PB14: JP10.33 U2.53 | length 19.8
  Top Layer w0.254: U2.53@45.291,74.168 55.284,84.161 59.135,84.161 JP10.33@60.405,82.891
HIL_PB15: JP10.7 U2.54 | length 17.4
  Top Layer w0.254: U2.54@44.937,74.521 55.847,85.431 JP10.7@57.865,85.431
HIL_PC0: JP10.22 U2.15 | length 36.5
  Top Layer w0.254: U2.15@31.502,66.036 30.575,65.109 30.575,63.3 32.026,61.849 v1(32.029,61.849) ; v1(50.368,56.2) 59.156,56.2 JP10.22@60.405,54.951
  Bottom Layer w0.254: v1(32.029,61.849) 32.091,61.911 32.71,61.911 32.725,61.925 33.25,61.925 38.975,56.2 v1(50.368,56.2)
HIL_PC1: JP10.18 U2.16 | length 31.7
  Top Layer w0.254: v1(31.806,62.975) 31.025,63.756 31.025,64.852 U2.16@31.856,65.682 ; v1(50.368,57.491) JP10.18@57.865,57.491
  Bottom Layer w0.254: v1(31.806,62.975) 34.325,62.975 39.809,57.491 v1(50.368,57.491)
HIL_PC2: JP10.23 U2.17 | length 33
  Top Layer w0.254: v1(31.695,64.071) 31.655,64.111 31.655,64.761 32.209,65.315 U2.17@32.209,65.329 ; v1@50.368,58.75 59.146,58.75 JP10.23@60.405,57.491
  Bottom Layer w0.254: v1(31.695,64.071) 35.329,64.071 40.7,58.7 v1(50.368,58.7)
HIL_PC3: JP10.17 U2.18 | length 28.7
  Top Layer w0.254: U2.18@32.563,64.975 32.569,64.975 34.144,66.55 v1(34.15,66.55) ; JP10.17@57.865,60.031 v1@50.374,60.031 ; v1@50.374,60.031 v1(50.368,60.025) v1@50.374,60.031
  Bottom Layer w0.254: v1(34.15,66.55) 34.85,66.55 41.375,60.025 v1(50.368,60.025)
HIL_PC4: JP10.24 U2.33 | length 23.7
  Top Layer w0.254: U2.33@39.987,64.975 42.672,62.29 v1(42.672,60.858) ; v1(50.368,61.3) 59.136,61.3 JP10.24@60.405,60.031
  Bottom Layer w0.254: v1(42.672,60.858) 49.847,60.858 50.288,61.3 v1@50.381,61.3
HIL_PC5: JP10.16 U2.34 | length 19.9
  Top Layer w0.254: U2.34@40.341,65.329 43.362,62.307 v1(43.362,61.595) ; v1(50.368,62.571) JP10.16@57.865,62.571
  Bottom Layer w0.254: v1(43.362,61.595) 49.392,61.595 v1(50.368,62.571)
HIL_PC6: JP10.25 U2.63 | length 45.6
  Top Layer w0.254: U2.63@41.755,77.703 49.835,85.783 v1(49.835,87.274) ; v1@54.407,63.297 55.304,63.297 ccw(c55.304,63.551) 55.457,63.348 ccw(c55.304,63.551) 55.483,63.371 55.964,63.851 59.022,63.851 cw(c59.02,63.597) 59.199,63.777 ; 59.199,63.777 JP10.25@60.405,62.571
  Bottom Layer w0.254: v1(49.835,87.274) 49.876,87.274 52.885,84.265 cw(c52.705,84.086) 52.959,84.086 52.959,65.001 ccw(c53.213,65.002) 53.032,64.824 v1(54.559,63.297)
HIL_PC7: JP10.15 U2.64 | length 44.1
  Top Layer w0.254: U2.64@41.402,78.057 48.671,85.326 48.671,87.715 49.154,88.198 49.791,88.198 v1(49.835,88.242) ; v1@54.407,64.406 55.296,64.406 ccw(c55.296,64.66) 55.448,64.457 ccw(c55.296,64.66) 55.475,64.48 56.106,65.111 JP10.15@57.865,65.111
  Bottom Layer w0.254: v1(49.835,88.242) 50.744,88.242 cw(c50.744,87.988) 50.896,88.191 cw(c50.744,87.988) 50.923,88.167 53.359,85.731 cw(c53.179,85.552) 53.433,85.552 53.433,65.459 ccw(c53.687,65.459) 53.508,65.28 v1@54.381,64.406
  other v1: 54.559,64.406
HIL_PC8: JP10.26 U2.65 | length 48.1
  Top Layer w0.254: U2.65@41.048,78.41 47.967,85.329 47.967,88.151 49.049,89.233 v1(49.835,89.233) ; v1@54.407,65.515 55.287,65.515 ccw(c55.287,65.769) 55.44,65.566 ccw(c55.287,65.769) 55.466,65.589 56.16,66.283 59.233,66.283 JP10.26@60.405,65.111
  Bottom Layer w0.254: v1(49.835,89.233) 51.102,89.233 cw(c51.102,88.979) 51.254,89.183 cw(c51.102,88.979) 51.281,89.159 53.834,86.606 cw(c53.655,86.426) 53.909,86.426 53.909,66.118 ccw(c54.163,66.118) 53.982,65.94 ; 53.983,65.939 v1@54.407,65.515
  other v1: 54.559,65.515
HIL_PC9: JP10.14 U2.66 | length 46.2
  Top Layer w0.254: U2.66@40.694,78.764 47.262,85.332 47.262,88.468 49.019,90.225 v1(49.835,90.225) ; v1@54.407,66.624 55.336,66.624 ccw(c55.336,66.878) 55.488,66.675 ccw(c55.336,66.878) 55.515,66.698 56.468,67.651 JP10.14@57.865,67.651
  Bottom Layer w0.254: v1(49.835,90.225) 51.575,90.225 cw(c51.575,89.971) 51.727,90.174 cw(c51.575,89.971) 51.755,90.151 54.485,87.42 ; 54.485,87.42 cw(c54.305,87.241) 54.559,87.241 v1(54.559,66.624)
HIL_PC13: JP10.27 U2.7 | length 41.6
  Top Layer w0.254: v1(27.102,66.65) 27.102,67.292 U2.7@28.674,68.864 ; v1(52.426,64.567) 52.426,65.986 cw(c52.68,65.986) 52.476,66.138 cw(c52.68,65.986) 52.5,66.165 55.186,68.851 cw(c55.365,68.671) 55.213,68.874 cw(c55.365,68.671) 55.365,68.925 59.131,68.925 JP10.27@60.405,67.651
  Bottom Layer w0.254: v1(27.102,66.65) 27.991,65.761 28.879,65.761 30.488,67.37 38.073,67.37 40.902,64.541 52.4,64.541 v1(52.426,64.567)
HIL_PC14: JP10.13 U2.8 | length 35.8
  Top Layer w0.254: v1(28.254,67.37) 28.254,67.737 U2.8@29.027,68.511 ; v1(51.498,65.202) 51.498,65.83 cw(c51.752,65.83) 51.549,65.983 cw(c51.753,65.83) 51.573,66.01 55.68,70.117 cw(c55.859,69.937) 55.707,70.14 cw(c55.859,69.937) 55.859,70.191 JP10.13@57.865,70.191
  Bottom Layer w0.254: v1(28.254,67.37) 29.736,68.852 37.904,68.852 41.537,65.219 ccw(c41.715,65.4) 41.714,65.146 v1@51.625,65.146
HIL_PC15: JP10.28 U2.9 | length 36.3
  Top Layer w0.254: U2.9@29.381,68.157 30.997,69.774 v1(31.039,69.774) ; v1(50.77,65.862) 50.836,65.928 50.836,66.178 56.035,71.376 cw(c56.214,71.196) 56.061,71.399 cw(c56.214,71.196) 56.214,71.45 59.146,71.45 JP10.28@60.405,70.191
  Bottom Layer w0.254: v1(31.039,69.774) 38.452,69.774 cw(c38.452,69.52) 38.604,69.723 cw(c38.452,69.52) 38.631,69.7 42.394,65.937 ; 42.395,65.936 ccw(c42.574,66.116) 42.574,65.862 v1(50.77,65.862)